# Altium PCB 60ghz radar pcb.PcbDoc (part 1 of 2)
Units mil, origin at the board's own origin, x right, y up, seen from the top; angles counter-clockwise.
Board outline 1181.1 x 787.4 mil, 4 copper layers (Top Layer, Mid Layer 1, Mid Layer 2, Bottom Layer), stack 61.811 mil thick; 51 components, 49 nets, 258 pads, 81 vias.
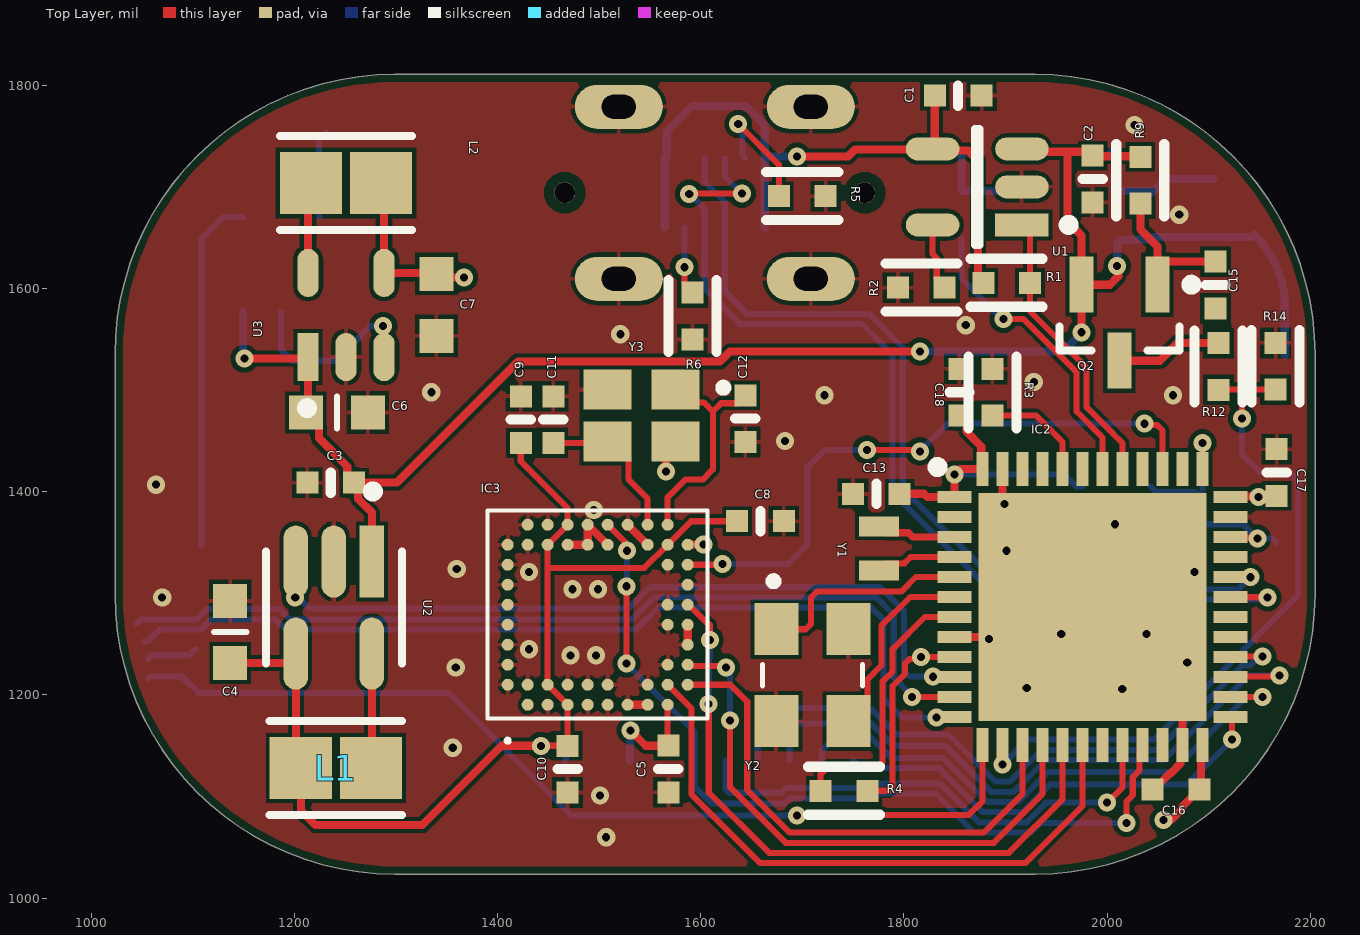
[diagram p0: Top Layer view]
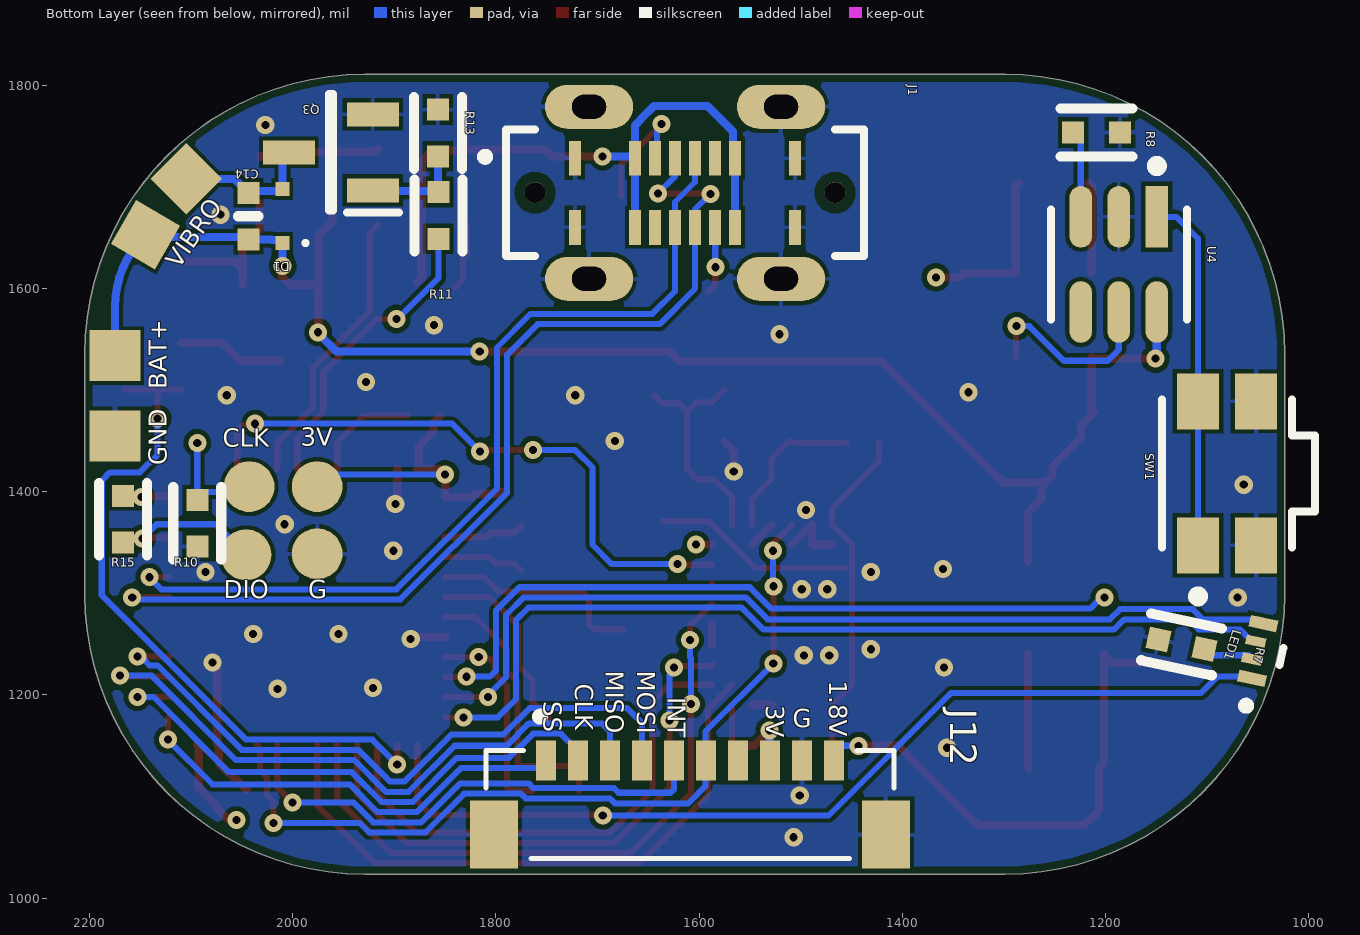
[diagram p1: Bottom Layer view, seen from below]
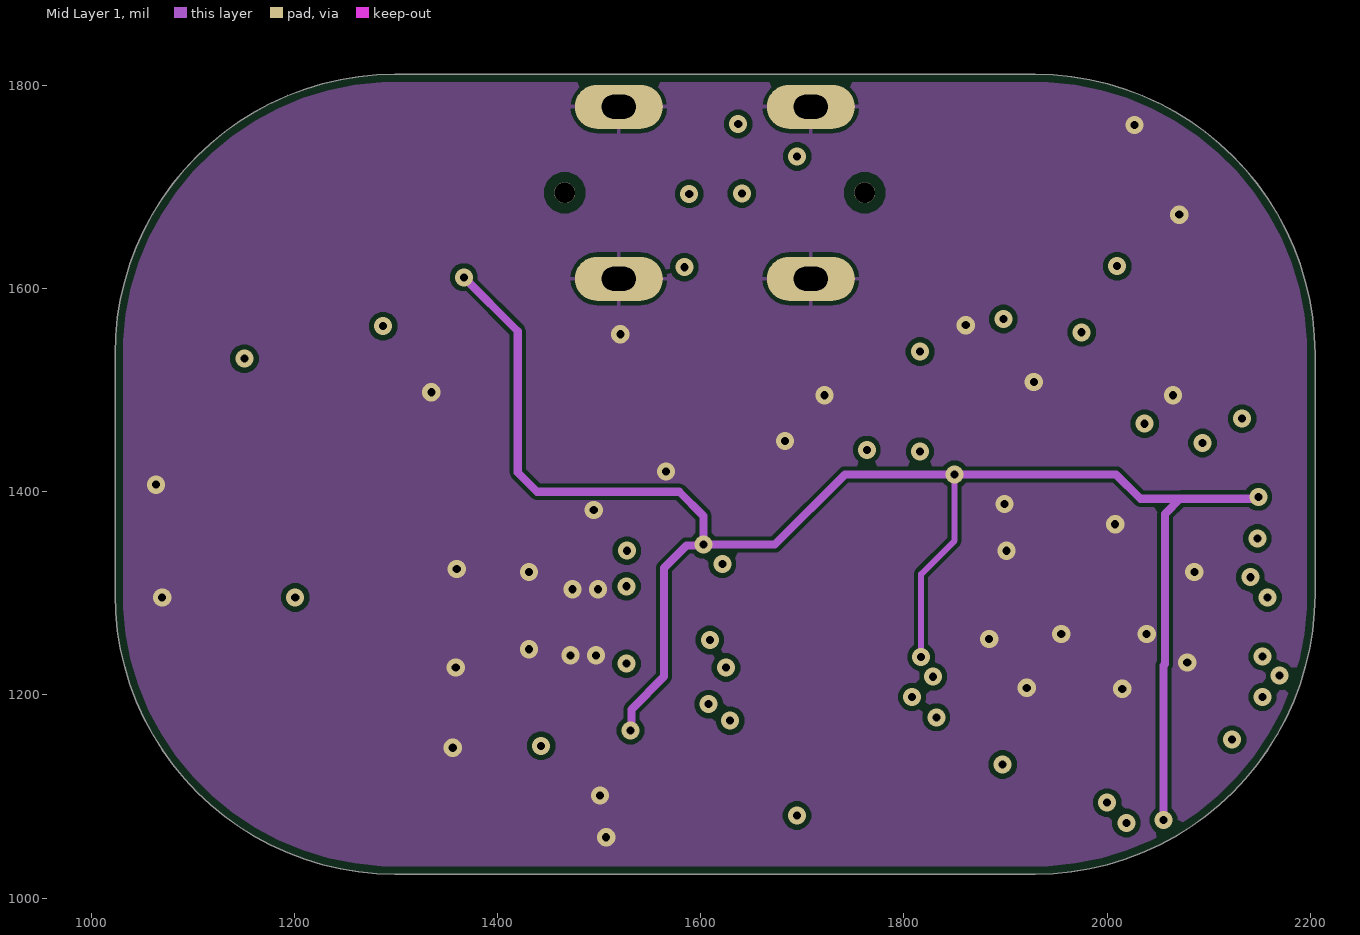
[diagram p2: Mid Layer 1]
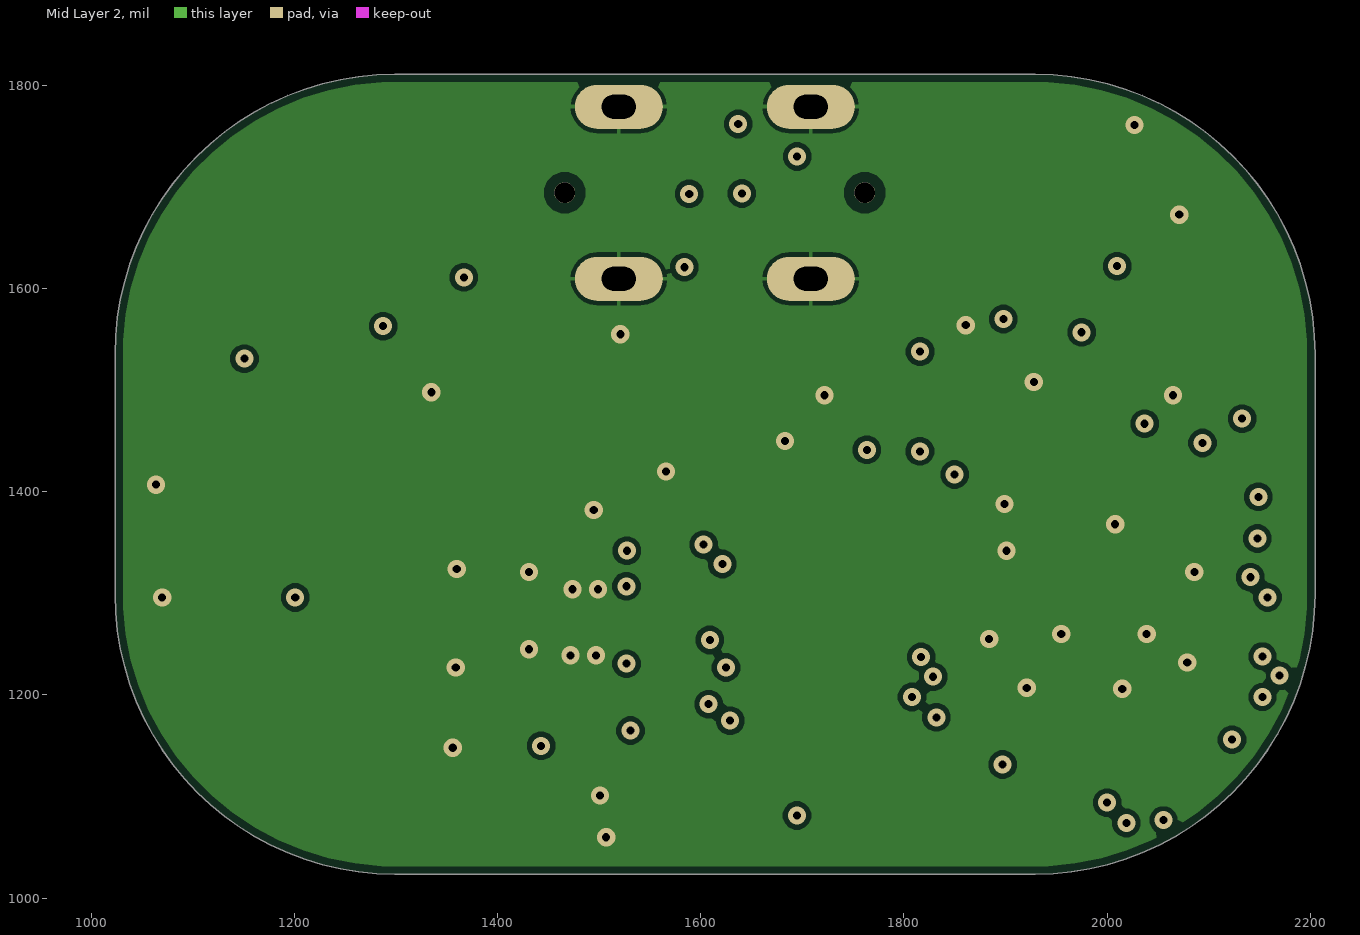
[diagram p3: Mid Layer 2]
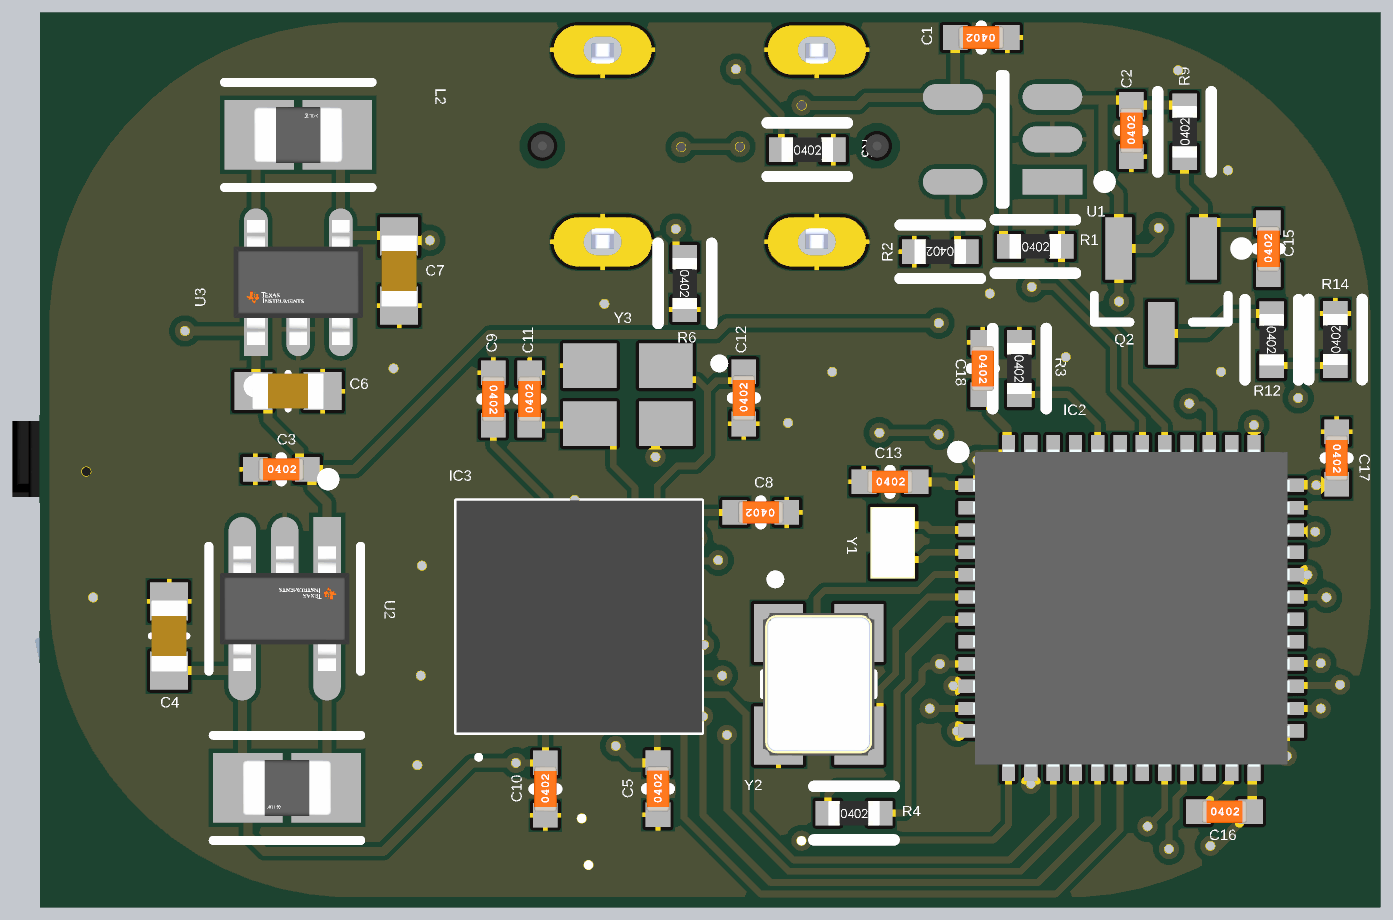
[diagram p4: 3D render of the assembled board from above, using the file's embedded part models]
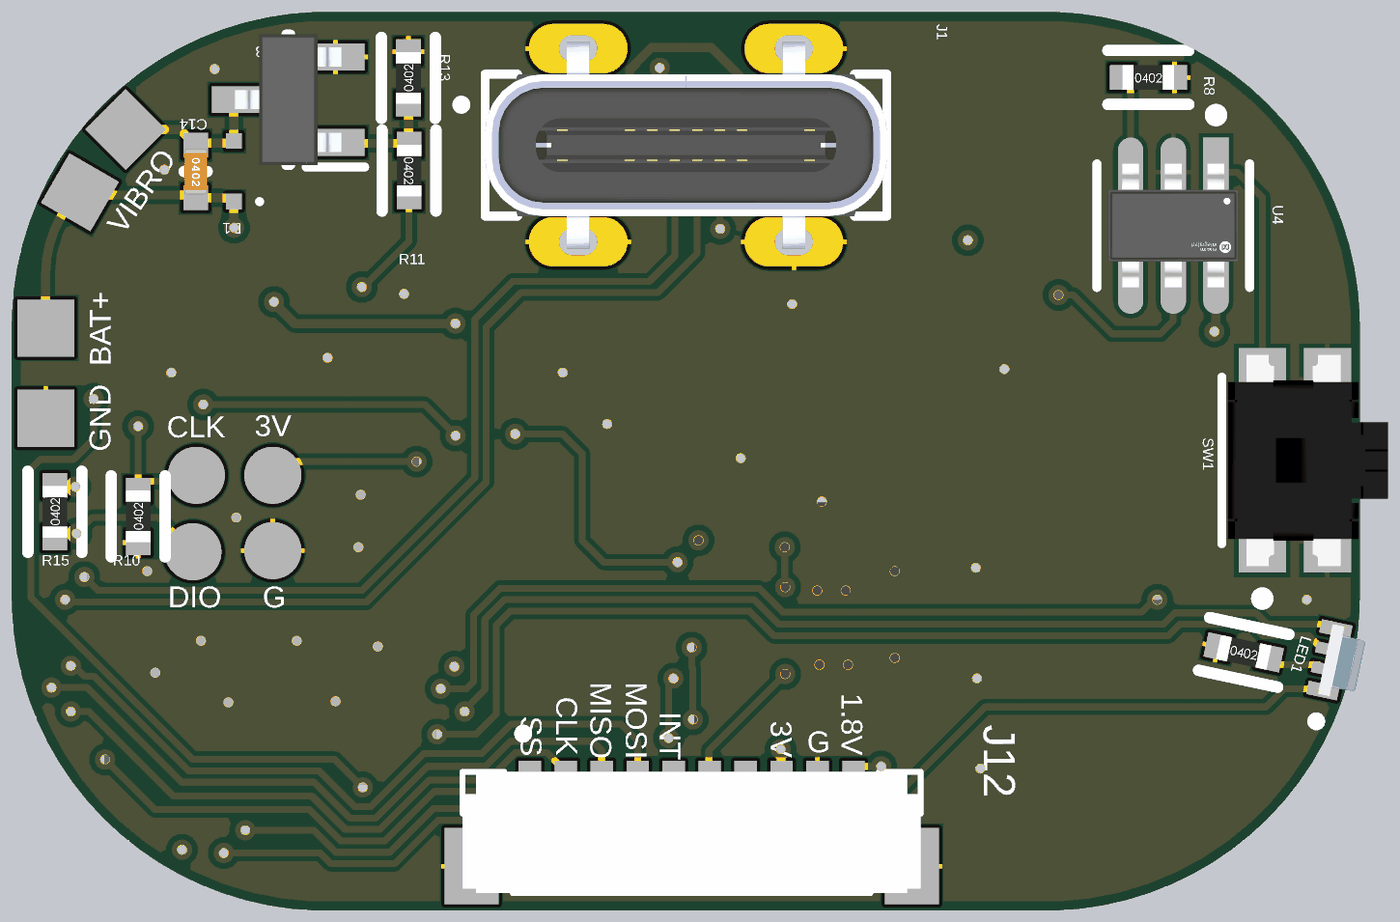
[diagram p5: 3D render of the assembled board from below, using the file's embedded part models]

## Layer stack, top to bottom
Top Solder: solder mask 0.5, Solder Resist, Dk 3.8
Top Layer: signal copper 1.378
Dielectric 1: prepreg 3.937, 2313, Dk 4.05
Mid Layer 1: signal copper 0.689
Core: core 49.8031, FR-4, Dk 4.5
Mid Layer 2: signal copper 0.689
Dielectric 2: prepreg 3.937, 2313, Dk 4.05
Bottom Layer: signal copper 1.378
Bottom Solder: solder mask 0.5, Solder Resist, Dk 3.8

## Board outline
1023.62,1299.21 1023.62,1535.43 cw(c1299.21,1535.43) 1299.21,1811.02 1929.13,1811.02 cw(c1929.13,1535.43) 2204.72,1535.43 2204.72,1299.21 cw(c1929.13,1299.21) 1929.13,1023.62 1299.21,1023.62 cw(c1299.21,1299.21)

## Design rules (kind name [scope] priority, off if disabled: settings)
BoardOutlineClearance [All] p1: gap=7.87 ignorepadtopadclearanceinfootprint=FALSE
Clearance [All] p1: gap=4 ignorepadtopadclearanceinfootprint=FALSE except(5: Arc-Via Track-Via SMDPad-Via THPad-Via Via-Via Via-Fill Via-Poly Via-Region Via-Text; 9.84: Arc-Hole Track-Hole SMDPad-Hole THPad-Hole Via-Hole Fill-Hole Poly-Hole Region-Hole Text-Hole)
ComponentClearance [All] p1: gap=4 collisioncheckmode=3 verticalgap=4 showdistances=TRUE
DiffPairsRouting [All] p1: maxlimit=4 minlimit=4 mostfreqgap=4 toplayer_minwidth=4 toplayer_maxwidth=71497.94 toplayer_prefwidth=4 midlayer1_minwidth=4 midlayer1_maxwidth=71497.94 midlayer1_prefwidth=4 midlayer2_minwidth=4 midlayer2_maxwidth=71497.94 midlayer2_prefwidth=4 bottomlayer_minwidth=4 bottomlayer_maxwidth=71497.94 bottomlayer_prefwidth=4 maxuncoupledlength=500
Height [All] p1: minheight=0 maxheight=71497.94 prefheight=500
HoleSize [All] p1: absolutevalues=TRUE maxlimit=248.03 minlimit=7.87 maxpercent=80.000 minpercent=20.000
HoleToHoleClearance [All] p1: gap=9.84 allowstackedmicrovias=FALSE
MinimumAnnularRing [All] p1: minimumring=3
MinimumSolderMaskSliver [All] p1: minsoldermaskwidth=0
PlaneClearance [All] p1: clearance=4
PlaneConnect PlaneConnectPowerPads [InPadClass('PowerPads')] p1: planeconnectstyle=Direct reliefexpansion=20 reliefentries=4 reliefconductorwidth=10 reliefairgap=10
PlaneConnect [All] p2: pad.planeconnectstyle=Relief pad.reliefexpansion=11.81 pad.reliefentries=4 pad.reliefconductorwidth=4 pad.reliefairgap=4 via.planeconnectstyle=Direct via.reliefexpansion=11.81 via.reliefentries=4 via.reliefconductorwidth=5 via.reliefairgap=5
PolygonConnect PolygonConnectPowerPads [All vs (InPadClass('PowerPads'))] p1: connectstyle=Direct reliefconductorwidth=10 reliefentries=4 polygonreliefangle="90 Angle" airgapwidth=10
PolygonConnect [All] p2: thpad.connectstyle=Relief thpad.reliefconductorwidth=4 thpad.reliefentries=4 thpad.polygonreliefangle="90 Angle" thpad.airgapwidth=4 smdpad.connectstyle=Relief smdpad.reliefconductorwidth=4 smdpad.reliefentries=4 smdpad.polygonreliefangle="90 Angle" smdpad.airgapwidth=4 via.connectstyle=Direct via.reliefconductorwidth=5 via.reliefentries=4 via.polygonreliefangle="90 Angle" via.airgapwidth=5
RoutingVias [All] p1: holewidth=7.87 width=17.72 viastyle="Through Hole" minholewidth=7.87 minwidth=17.72 maxholewidth=248.03 maxwidth=257.87
SilkToSilkClearance [All] p1: silktosilkclearance=0
SilkToSolderMaskClearance [IsPad] p1: minsilkscreentomaskgap=4 clearancetoexposedcopper=TRUE
SolderMaskExpansion [All] p1: expansion=2.95 istentingtop=FALSE
Width [All] p1: maxlimit=71497.94 minlimit=4 preferedwidth=4
20 further rules are at their usual default settings.

## Classes and differential pairs
component class "radar sch": C5 C8 C9 C10 C11 C12 IC3 J12 Y3
component class "power schematic": C1 C2 C3 C4 C6 C7 L1 L2 R1 R2 R8 SW1 U1 U2 U3 U4
component class "main sch": C13 C16 C17 C18 IC2 J1 LED1 R3 R4 R5 R6 R7 R10 R15 Y1 Y2
component class "battery check and motor": C14 C15 D1 Q2 Q3 R9 R11 R12 R13 R14

## Components (designator, comment, footprint, x,y, rotation, side; value= is the part's Value field where it differs from the comment)
C1 "4.7µF" SMD-0402C 1853.5,1789.93 r90 top
C2 "4.7µF" SMD-0402C 1985.95,1707.91 r0 top
C3 "10µF" SMD-0402C 1236,1409 r270 top
C4 "22µF" SMD-0603C 1137,1262 r180 top
C5 "1µF" SMD-0402C 1568.29,1127.16 r0 top
C6 "22µF" SMD-0603C 1242,1478 r90 top
C7 "22µF" SMD-0603C 1340,1584 r0 top
C8 "1µF" SMD-0402C 1659,1371 r90 top
C9 "1µF" SMD-0402C 1423,1471 r180 top
C10 "1µF" SMD-0402C 1469,1127 r0 top
C11 "8pF" SMD-0402C 1455,1471 r0 top
C12 "8pF" SMD-0402C 1644,1472 r0 top
C13 "1µF" SMD-0402C 1773,1398 r270 top
C14 "0.10µF" SMD-0402C 2043.64,1671.24 r0 bottom
C15 "0.10µF" SMD-0402C 2106.81,1603.57 r0 top
C16 "0.10µF" SMD-0402C 2068,1107 r270 top
C17 "0.10µF" SMD-0402C 2167,1419 r180 top
C18 "4.7µF" SMD-0402C 1854.82,1497.94 r180 top
D1 "BAT54-02V" INF-SC79_V 2010.21,1671.24 r90 bottom
IC2 "STM32L433CCU6" QFN50P700X700X60-49N-D 1985.8,1286.57 r0 top
IC3 "A121-001-T&R" A121001TR 1498.7,1278.98 r90 top
J1 "USB4120-03-C_REVA" GCT_USB4120-03-C_REVA 1613.94,1694.29 r180 bottom
J12 "10144041-10011LF" AMPHENOL_10144041-10011LF 1609,1092 r180 bottom
L1 "MLZ2012N2R2LT000" FP-MLZ2012-0_85-IPC_A 1241,1128 r180 top
L2 "MLZ2012N2R2LT000" FP-MLZ2012-0_85-IPC_A 1251,1704 r0 top
LED1 "IN-S63TBS5R5G5B" INS63TBS5R5G5B 1054.08,1244.14 r12 bottom
Q2 "NX3008PBK,215" NXP-SOT23_N 2012.17,1566.4 r270 top
Q3 "SI2312BDS-T1-BE3" SOT95P237X112-3N 1962.47,1734.14 r0 bottom
R1 "DNP" SMD-0402-RES 1901.2,1605.67 r270 top value=10k
R2 "3.3k" SMD-0402-RES 1817.27,1600.95 r90 top
R3 "10k" SMD-0402-RES 1887.13,1497.87 r180 top
R4 "10k" SMD-0402-RES 1741.16,1105.71 r270 top
R5 "5.1k" SMD-0402-RES 1700,1691 r270 top
R6 "5.1k" SMD-0402-RES 1592,1573 r180 top
R7 "330" SMD-0402-RES 1125.29,1249.84 r282 bottom
R8 "10k" SMD-0402-RES 1208.84,1753.65 r270 bottom
R9 "1M" SMD-0402-RES 2032.79,1706.69 r0 top
R10 "100k" SMD-0402-RES 2094,1369 r180 bottom
R11 "470" SMD-0402-RES 1856.67,1672.03 r0 bottom
R12 "100k" SMD-0402-RES 2109.71,1523.28 r180 top
R13 "10k" SMD-0402-RES 1857.22,1753.2 r180 bottom
R14 "100k" SMD-0402-RES 2165.88,1523.47 r0 top
R15 "100k" SMD-0402-RES 2167,1373 r180 bottom
SW1 "EVQ-P7A01P" FP-EVQ-P7A01P-MFG 1067.68,1418.07 r90 bottom
U1 "MCP73831T-2ACI/OT" FP-C04-091-OT-IPC_B 1872.31,1700.05 r180 top
U2 "LM3671MF-1.8/NOPB" FP-DBV0005A-IPC_A 1239,1286 r270 top
U3 "LM3671MF-3.3/NOPB" FP-DBV0005A-IPC_C 1251,1574 r90 top
U4 "MAX16054AZT+T" FP-Z6-1-IPC_A 1186.99,1623.77 r270 bottom
Y1 "ECS-.327-12.5-16-TR" XTAL_ECS-.327-12.5-16-TR 1775.54,1344.37 r270 top
Y2 "ECS-80-12-33-JGN-TR" XTAL_ECS-240-8-33-AGN-TR 1710.02,1219.42 r270 top
Y3 "ECS-240-8-36-RWN-TR3" XTAL_ECS-240-8-36-RWN-TR3 1541.71,1474.84 r180 top

## Footprints (in the part's own frame and the unit in brackets; to place one, negate y for a bottom-side part, rotate by r counter-clockwise, add the part's x,y. Pads: shape width x height; smd on the part's side, far side on the other; paste and mask are expansions set on the pad)
A121001TR [mm]
  round 0.3 smd: A2(-1.75,2.25) A3(-1.25,2.25) A4(-0.75,2.25) A5(-0.25,2.25) A6(0.25,2.25) A7(0.75,2.25) A8(1.25,2.25) A9(1.75,2.25) B1(-2.25,1.75) B2(-1.75,1.75) B9(1.75,1.75) B10(2.25,1.75) C1(-2.25,1.25) C2(-1.75,1.25) C9(1.75,1.25) C10(2.25,1.25) D1(-2.25,0.75) D2(-1.75,0.75) D9(1.75,0.75) D10(2.25,0.75) E1(-2.25,0.25) E2(-1.75,0.25) E9(1.75,0.25) E10(2.25,0.25) F1(-2.25,-0.25) F2(-1.75,-0.25) F9(1.75,-0.25) F10(2.25,-0.25) G1(-2.25,-0.75) G10(2.25,-0.75) H1(-2.25,-1.25) H2(-1.75,-1.25) H9(1.75,-1.25) H10(2.25,-1.25) J1(-2.25,-1.75) J2(-1.75,-1.75) J3(-1.25,-1.75) J5(-0.25,-1.75) J6(0.25,-1.75) J8(1.25,-1.75) J9(1.75,-1.75) J10(2.25,-1.75) K2(-1.75,-2.25) K3(-1.25,-2.25) K4(-0.75,-2.25) K5(-0.25,-2.25) K6(0.25,-2.25) K7(0.75,-2.25) K8(1.25,-2.25) K9(1.75,-2.25)
  silkscreen extent -3.2,-2.75 2.6,2.75, body extent -2.6,-2.75 2.6,2.75, height 0.88
AMPHENOL_10144041-10011LF [mm]
  rect 0.5x1 smd: 1(-3.6,1.1) 2(-2.8,1.1) 3(-2,1.1) 4(-1.2,1.1) 5(-0.4,1.1) 6(0.4,1.1) 7(1.2,1.1) 8(2,1.1) 9(2.8,1.1) 10(3.6,1.1)
  rect 1.2x1.7 smd: S1(-4.9,-0.75) S2(4.9,-0.75)
  silkscreen extent -5.1,-1.35 5.1,2.3, body extent -5.1,-1.35 5.1,1.35, height 1.72
FP-C04-091-OT-IPC_B [mm]
  rect 1.338x0.578 smd paste+0 mask+0: 1(-1.116,0.95)
  rrect100% 1.338x0.578 smd paste+0 mask+0: 2(-1.116,0) 3(-1.116,-0.95) 4(1.116,-0.95) 5(1.116,0.95)
  silkscreen extent -2.41,-1.45 0.05,1.45
FP-DBV0005A-IPC_A [mm]
  rect 1.805x0.612 smd paste+0 mask+0: 1(-1.15,0.95)
  rrect100% 1.805x0.612 smd paste+0 mask+0: 2(-1.15,0) 3(-1.15,-0.95) 4(1.15,-0.95) 5(1.15,0.95)
  silkscreen extent -3.03,-1.7 1.4,1.7, body extent -2.55,-1.95 2.55,1.95, height 0.25
FP-DBV0005A-IPC_C [mm]
  rect 1.205x0.532 smd paste+0 mask+0: 1(-1.05,0.95)
  rrect100% 1.205x0.532 smd paste+0 mask+0: 2(-1.05,0) 3(-1.05,-0.95) 4(1.05,-0.95) 5(1.05,0.95)
  silkscreen extent -2.45,0.85 -2.2,1.1, body extent -1.75,-1.55 1.75,1.55, height 0.25
FP-EVQ-P7A01P-MFG [mm]
  rect 1.4x1.05 smd paste+0 mask+0: 1(-1.8,1.05) 1'(1.8,1.05) 2(-1.8,-0.4) 2'(1.8,-0.4)
  silkscreen extent -3.2,-1.88 1.85,1.95, body extent -2.35,-1.74 2.35,1.81, height 1.36
FP-MLZ2012-0_85-IPC_A [mil]
  rect 61.2x61.27 smd paste+0 mask+0: 1(-34.48,0) 2(34.48,0)
  silkscreen extent -65,-46 65,46, body extent -85,-50 85,50, height 10
FP-Z6-1-IPC_A [mm]
  rect 1.54x0.566 smd paste+0 mask+0: 1(-1.19,0.95)
  rrect100% 1.54x0.566 smd paste+0 mask+0: 2(-1.19,0) 3(-1.191,-0.95) 4(1.191,-0.95) 5(1.191,0) 6(1.191,0.95)
  silkscreen extent -2.59,-1.7 1.38,1.7, body extent -1.38,-1.45 1.38,1.45, height 1.1
GCT_USB4120-03-C_REVA [mm]
  rect 0.3x0.87 smd: A1(-2.75,0.865) A4(-1.25,0.865) A5(-0.75,0.865) A6(-0.25,0.865) A7(0.25,0.865) A8(0.75,0.865) A9(1.25,0.865) A12(2.75,0.865) B1(2.75,-0.865) B4(1.25,-0.865) B5(0.75,-0.865) B6(0.25,-0.865) B7(-0.25,-0.865) B8(-0.75,-0.865) B9(-1.25,-0.865) B12(-2.75,-0.865)
  oval 2.2x1.1 hole 0.6 slot 0.85 at 0 deg: S1(-2.4,2.15) S2(-2.4,-2.15) S3(2.4,2.15) S4(2.4,-2.15)
  round 0.52 hole 0.52 unplated: ""(-3.75,0) ""(3.75,0)
  silkscreen extent -5.1,-1.58 4.47,1.58, body extent -4.47,-2.3 4.47,2.3, height 6.5
INF-SC79_V [mm]
  rect 0.35x0.35 smd: 1(-0.672,0) 2(0.678,0)
  silkscreen extent -0.72,-0.62 -0.62,-0.53, body extent -0.6,-0.4 0.6,0.4, height 0.59
INS63TBS5R5G5B [mm]
  rect 0.7x0.3 smd: 1(-0.1,0.7) 4(-0.1,-0.7)
  rect 0.5x0.25 smd: 2(0,0.225) 3(0,-0.225)
  silkscreen extent -0.71,-0.2 0,1.5, body extent -0.8,-0.8 0,0.8, height 0.5
NXP-SOT23_N [mm]
  rect 1.4x0.6 smd: 1(-0.95,0.95) 2(-0.95,-0.95) 3(0.95,0)
  silkscreen extent -1.07,-1.5 0.7,1.93, body extent -0.7,-1.5 0.7,1.5, height 1.1
QFN50P700X700X60-49N-D [mm]
  rect 0.85x0.3 smd: 1(-3.45,2.75) 2(-3.45,2.25) 3(-3.45,1.75) 4(-3.45,1.25) 5(-3.45,0.75) 6(-3.45,0.25) 7(-3.45,-0.25) 8(-3.45,-0.75) 9(-3.45,-1.25) 10(-3.45,-1.75) 11(-3.45,-2.25) 12(-3.45,-2.75) 25(3.45,-2.75) 26(3.45,-2.25) 27(3.45,-1.75) 28(3.45,-1.25) 29(3.45,-0.75) 30(3.45,-0.25) 31(3.45,0.25) 32(3.45,0.75) 33(3.45,1.25) 34(3.45,1.75) 35(3.45,2.25) 36(3.45,2.75)
  rect 0.3x0.85 smd: 13(-2.75,-3.45) 14(-2.25,-3.45) 15(-1.75,-3.45) 16(-1.25,-3.45) 17(-0.75,-3.45) 18(-0.25,-3.45) 19(0.25,-3.45) 20(0.75,-3.45) 21(1.25,-3.45) 22(1.75,-3.45) 23(2.25,-3.45) 24(2.75,-3.45) 37(2.75,3.45) 38(2.25,3.45) 39(1.75,3.45) 40(1.25,3.45) 41(0.75,3.45) 42(0.25,3.45) 43(-0.25,3.45) 44(-0.75,3.45) 45(-1.25,3.45) 46(-1.75,3.45) 47(-2.25,3.45) 48(-2.75,3.45)
  rect 5.7x5.7 smd: 49(0,0)
  silkscreen extent -4,3.38 -3.75,3.62, body extent -3.55,-3.55 3.55,3.55, height 0.6
SMD-0402-RES [mm]
  rect 0.55x0.55 smd: 1(0,0.584) 2(0,-0.584)
  silkscreen extent -0.6,-0.9 0.6,0.9, body extent -0.27,-0.57 0.28,0.58, height 0.41
SMD-0402C [mm]
  rect 0.55x0.55 smd: 1(0,0.584) 2(0,-0.584)
  silkscreen extent -0.25,0 0.25,0, body extent -0.25,-0.51 0.25,0.51, height 0.51
SMD-0603C [mm]
  rect 0.85x0.85 smd: 1(0,0.775) 2(0,-0.775)
  silkscreen extent -0.4,0 0.4,0, body extent -0.4,-0.8 0.4,0.8, height 0.9
SOT95P237X112-3N [mm]
  rect 1.3x0.6 smd: 1(-1.05,0.95) 2(-1.05,-0.95) 3(1.05,0)
  silkscreen extent -1.7,-1.46 0.05,1.5, body extent -1.19,-1.46 1.18,1.46, height 1.12
XTAL_ECS-240-8-33-AGN-TR [mm]
  rect 1.3x1.1 smd: 1(-1.15,-0.9) 2(1.15,-0.9) 3(1.15,0.9) 4(-1.15,0.9)
  silkscreen extent -2.45,-1.25 0.27,1.25, body extent -1.6,-1.25 1.6,1.25, height 0.8
XTAL_ECS-240-8-36-RWN-TR3 [mm]
  rect 1.2x1 smd: 1(-0.85,-0.65) 2(0.85,-0.65) 3(0.85,0.65) 4(-0.85,0.65)
  silkscreen extent -2.15,-0.8 -1.95,-0.6
XTAL_ECS-.327-12.5-16-TR [mm]
  rect 0.5x1 smd: 1(-0.55,0) 2(0.55,0)
  body extent -0.8,-0.5 0.8,0.5, height 0.5

## Part data
C1 C2: library part ZRB15XR61A475KE01D, "CAP CER 4.7UF 10V X5R 0402", Digi-Key Part Number=490-13252-1-ND, Manufacturer="Murata Electronics North America", Operating Temperature="-55°C ~ 85°C", Package / Case="0402 (1005 Metric)", Ratings=-, Temperature Coefficient=X5R, Tolerance=±10%, Voltage=10V, @ qty=0, Applications="Acoustic Noise Reduction", Datasheets=http://search.murata.co.jp/Ceramy/image/img/A01X/G101/ENG/ZRB15XR61A475KE01-01.pdf, Factory Stock=0, Features="Derating Recommended, Interposer Termination", Height - Seated (Max)=-, Image=//media.digikey.com/Renders/Murata%20Renders/ZRB-SERIES-0402.jpg, Lead Spacing=-, Lead Style=-, Minimum Quantity=1, Mounting Type="Surface Mount, MLCC", Packaging="Cut Tape (CT)", Part Number=ZRB15XR61A475KE01D, Part Status=Active, Quantity Available=23076, Series=ZRB, Size / Dimension="0.039\" L x 0.020\" W (1.00mm x 0.50mm)", Thickness (Max)="0.031\" (0.80mm)", Unit Price (USD)=0.28
C3: library part GRJ155R60J106ME11D, "CAP CER 10UF 6.3V X5R 0402", Digi-Key Part Number=490-13211-1-ND, Manufacturer="Murata Electronics North America", Operating Temperature="-55°C ~ 85°C", Package / Case="0402 (1005 Metric)", Ratings=-, Temperature Coefficient=X5R, Tolerance=±20%, Voltage=6.3V, @ qty=0, Applications="Boardflex Sensitive", Datasheets=http://psearch.en.murata.com/capacitor/product/GRJ155R60J106ME11%23.pdf, Factory Stock=0, Features="Derating Recommended, Soft Termination", Height - Seated (Max)=-, Image=//media.digikey.com/Renders/Murata%20Renders/ZRB-SERIES-0402.jpg, Lead Spacing=-, Lead Style=-, Minimum Quantity=1, Mounting Type="Surface Mount, MLCC", Packaging="Cut Tape (CT)", Part Number=GRJ155R60J106ME11D, Part Status=Active, Quantity Available=64064, Series=GRJ, Size / Dimension="0.039\" L x 0.020\" W (1.00mm x 0.50mm)", Thickness (Max)="0.028\" (0.70mm)", Unit Price (USD)=0.23
C4 C6 C7: library part GRM186R60J226ME15D, "CAP CER 22UF 6.3V X5R 0603", Digi-Key Part Number=490-13241-1-ND, Manufacturer="Murata Electronics North America", Operating Temperature="-55°C ~ 85°C", Package / Case="0603 (1608 Metric)", Ratings=-, Temperature Coefficient=X5R, Tolerance=±20%, Voltage=6.3V, @ qty=0, Applications="General Purpose", Datasheets=http://psearch.en.murata.com/capacitor/product/GRM186R60J226ME15%23.pdf, Factory Stock=0, Features="Derating Recommended", Height - Seated (Max)=-, Image=//media.digikey.com/Renders/Murata%20Renders/ZRB-SERIES-0402.jpg, Lead Spacing=-, Lead Style=-, Minimum Quantity=1, Mounting Type="Surface Mount, MLCC", Packaging="Cut Tape (CT)", Part Number=GRM186R60J226ME15D, Part Status=Active, Quantity Available=5072, Series=GRM, Size / Dimension="0.063\" L x 0.031\" W (1.60mm x 0.80mm)", Thickness (Max)="0.028\" (0.70mm)", Unit Price (USD)=0.32
C5 C8 C9 C10 C13: library part GCM155C71A105KE38D, "CAP CER 1UF 10V X7S 0402", Digi-Key Part Number=490-13409-1-ND, Manufacturer="Murata Electronics North America", Operating Temperature="-55°C ~ 125°C", Package / Case="0402 (1005 Metric)", Ratings=AEC-Q200, Temperature Coefficient=X7S, Tolerance=±10%, Voltage=10V, @ qty=0, Applications=Automotive, Datasheets=http://www.murata.com/~/media/webrenewal/support/library/catalog/products/capacitor/mlcc/c03e.ashx, Factory Stock=0, Features=-, Height - Seated (Max)=-, Image=//media.digikey.com/Renders/Murata%20Renders/ZRB-SERIES-0402.jpg, Lead Spacing=-, Lead Style=-, Minimum Quantity=1, Mounting Type="Surface Mount, MLCC", Packaging="Cut Tape (CT)", Part Number=GCM155C71A105KE38D, Part Status=Active, Quantity Available=7240, Series=GCM, Size / Dimension="0.039\" L x 0.020\" W (1.00mm x 0.50mm)", Thickness (Max)="0.022\" (0.55mm)", Unit Price (USD)=0.12
C11 C12: library part GRM1555C1H8R0BA01D, "CAP CER 8PF 50V NP0 0402", Digi-Key Part Number=490-8230-1-ND, Manufacturer="Murata Electronics North America", Operating Temperature="-55°C ~ 125°C", Package / Case="0402 (1005 Metric)", Ratings=-, Temperature Coefficient="C0G, NP0", Tolerance=±0.1pF, Voltage=50V, @ qty=0, Applications="General Purpose", Datasheets=http://www.murata.com/~/media/webrenewal/support/library/catalog/products/capacitor/mlcc/c02e.pdf, Factory Stock=0, Features=-, Height - Seated (Max)=-, Image=//media.digikey.com/Renders/Murata%20Renders/ZRB-SERIES-0402.jpg, Lead Spacing=-, Lead Style=-, Minimum Quantity=1, Mounting Type="Surface Mount, MLCC", Packaging="Cut Tape (CT)", Part Number=GRM1555C1H8R0BA01D, Part Status=Active, Quantity Available=3665, Series=GRM, Size / Dimension="0.039\" L x 0.020\" W (1.00mm x 0.50mm)", Thickness (Max)="0.022\" (0.55mm)", Unit Price (USD)=0.1
C14 C15 C16 C17: library part GCM155R71C104KA55D, "CAP CER 0.1UF 16V X7R 0402", Digi-Key Part Number=490-4759-1-ND, Manufacturer="Murata Electronics North America", Operating Temperature="-55°C ~ 125°C", Package / Case="0402 (1005 Metric)", Ratings=AEC-Q200, Temperature Coefficient=X7R, Tolerance=±10%, Voltage=16V, @ qty=0, Applications=Automotive, Datasheets=http://www.murata.com/~/media/webrenewal/support/library/catalog/products/capacitor/mlcc/c03e.ashx, Factory Stock=0, Features=-, Height - Seated (Max)=-, Image=//media.digikey.com/Renders/Murata%20Renders/ZRB-SERIES-0402.jpg, Lead Spacing=-, Lead Style=-, Minimum Quantity=1, Mounting Type="Surface Mount, MLCC", Packaging="Cut Tape (CT)", Part Number=GCM155R71C104KA55D, Part Status=Active, Quantity Available=734194, Series=GCM, Size / Dimension="0.039\" L x 0.020\" W (1.00mm x 0.50mm)", Thickness (Max)="0.022\" (0.55mm)", Unit Price (USD)=0.1
C18: library part GRM153R60J475ME15D, "CAP CER 4.7UF 6.3V X5R 0402", Digi-Key Part Number=490-13232-1-ND, Manufacturer="Murata Electronics North America", Operating Temperature="-55°C ~ 85°C", Package / Case="0402 (1005 Metric)", Ratings=-, Temperature Coefficient=X5R, Tolerance=±20%, Voltage=6.3V, @ qty=0, Applications="General Purpose", Datasheets=http://psearch.en.murata.com/capacitor/product/GRM153R60J475ME15%23.pdf, Factory Stock=0, Features="Derating Recommended", Height - Seated (Max)=-, Image=//media.digikey.com/Renders/Murata%20Renders/ZRB-SERIES-0402.jpg, Lead Spacing=-, Lead Style=-, Minimum Quantity=1, Mounting Type="Surface Mount, MLCC", Packaging="Cut Tape (CT)", Part Number=GRM153R60J475ME15D, Part Status=Active, Quantity Available=30412, Series=GRM, Size / Dimension="0.039\" L x 0.020\" W (1.00mm x 0.50mm)", Thickness (Max)="0.013\" (0.33mm)", Unit Price (USD)=0.27
D1: library part CMP-1182-00001-1, "Silicon Schottky Diode, SC79, Reel, Green", Manufacturer=Infineon, ComponentLink1Description="Manufacturer URL", ComponentLink1URL=http://www.infineon.com/, ComponentLink2Description=Datasheet, ComponentLink2URL=http://www.infineon.com/dgdl/bat54series.pdf?folderId=db3a30431400ef68011425f1ca2505e3&fileId=db3a304314dca3890115190b74210ea6, ComponentLink3Description="Package Specification", ComponentLink3URL=http://www.infineon.com/dgdl/SC79-Package_Overview.pdf?folderId=db3a30431936bc4b011951fbddb03b15&fileId=db3a30431936bc4b01195226fe583b41, Green=TRUE, Halogen-free=FALSE, Mounting Technology="Surface Mount", PackageDescription="2-Pin Semiconductor Package, 0.8 x 1.2 mm Body", PackageReference=SC79, PartNumber=BAT54-02V, RevisionNote="Re-Activated Devices"
IC2: "Integrated Circuit", Manufacturer_Name=STMicroelectronics, Mouser Part Number=511-STM32L433CCU6, Arrow Part Number=STM32L433CCU6, Arrow Price/Stock=https://www.arrow.com/en/products/stm32l433ccu6/stmicroelectronics?region=nac, Datasheet Link=http://www.st.com/content/ccc/resource/technical/document/datasheet/f7/a0/fc/27/24/4e/4f/3f/DM00257192.pdf/files/DM00257192.pdf/jcr:content/translations/en.DM00257192.pdf, Height=0.6mm, Manufacturer_Part_Number=STM32L433CCU6, Mouser Price/Stock=https://www.mouser.co.uk/ProductDetail/STMicroelectronics/STM32L433CCU6?qs=dTJS0cRn7oiKq9T6SJeUpg%3D%3D
IC3: "Integrated Circuit", Manufacturer_Name="Acconeer AB", Mouser Part Number=925-A121-001-T&R, Datasheet Link=https://gr.mouser.com/datasheet/2/1126/A121_datasheet-3133196.pdf, Height=0.899mm, Manufacturer_Part_Number=A121-001-T&R, Mouser Price/Stock=https://www.mouser.co.uk/ProductDetail/Acconeer/A121-001-TR?qs=amGC7iS6iy%2F9krRiPHmNkQ%3D%3D
J1 J12 Y3: Package=None, Availability=Unavailable, Price=None
  J1: MF="{'manufacturer': u'Global Connector Technology'}", MP=USB4120-03-C_REVA
  J12: MF="{'manufacturer': u'Amphenol ICC (FCI)'}", MP=10144041-10011LF
  Y3: MF="{'manufacturer': u'ECS Inc.'}", MP=ECS-240-8-36-RWN-TR3
L1 L2: library part CMP-08253-000395-1, "Shielded Multilayer Inductor 2.2uH ±20% 800mA 156mΩ SMD 0805", Case Code (Imperial)=0805, Case Code (Metric)=2012, Current Rating=800mA, DC Resistance (DCR)=156mR, Inductance=2.2uH, Max Operating Temperature=125°C, Min Operating Temperature=-55°C, Package Quantity=1, Saturation Current=170mA, Self Resonant Frequency=120MHz, Test Frequency=2MHz, Tolerance=20%, Case/Package=0805, Core Material=Ferrite, Height - Seated (Max)=0.041inch, Length=0.079inch, Mount="Surface Mount", Packaging="Tape and Reel", RoHS Compliant=Yes, Shielding=Shielded, Width=0.049inch
LED1: "LED", Manufacturer_Name=Inolux, Mouser Part Number=743-IN-S63TBS5R5G5B, Arrow Part Number=IN-S63TBS5R5G5B, Arrow Price/Stock=https://www.arrow.com/en/products/in-s63tbs5r5g5b/inolux-corporation?region=nac, Datasheet Link=http://www.inolux-corp.com/datasheet/SMDLED/RGB%20Side%20View/IN-S63TBS5R5G5B_V1.0.pdf, Height=0.6mm, Manufacturer_Part_Number=IN-S63TBS5R5G5B, Mouser Price/Stock=https://www.mouser.co.uk/ProductDetail/Inolux/IN-S63TBS5R5G5B?qs=stqOd1AaK7%2Fi2QYkhDu%252BwA%3D%3D
Q2: library part CMP-1259-00084-1, "P-Channel Trench MOSFET, -30 V, -0.23 A, -55 to 150 degC, 3-Pin SOT23, Tape and Reel", Manufacturer="NXP Semiconductors", Automotive Qualified=Y, Channel Type=P, Code_JEDEC=TO-236AB, ComponentLink1Description="Manufacturer URL", ComponentLink1URL=http://www.nxp.com/, ComponentLink2Description=Datasheet, ComponentLink2URL=http://www.nxp.com/documents/data_sheet/NX3008PBK.pdf, ComponentLink3Description="Package Specification", ComponentLink3URL=http://www.nxp.com/documents/outline_drawing/sot023_po.pdf, DatasheetVersion="Rev. 1", ID [max] (A)=-0.23, IDM [max] (A)=-1, Mounting Technology="Surface Mount", PackageDescription="3-Pin Small Outline Transistor Package, Body 2.9 x 1.3 mm, Pitch 0.95 mm", PackageReference=SOT23, PackageVersion="06-03-16, 03/2006", Packing="Tape & Reel", PartNumber=NX3008PBK,215, VDS [max] (V)=-30, VGSth [typ] (V)=-0.9
Q3: "MOSFET (N-Channel)", Manufacturer_Name=Vishay, Mouser Part Number=78-SI2312BDS-T1-BE3, Arrow Part Number=SI2312BDS-T1-BE3, Arrow Price/Stock=https://www.arrow.com/en/products/si2312bds-t1-be3/vishay?region=nac, Datasheet Link=https://www.mouser.in/datasheet/2/427/VISH_S_A0010924773_1-2571514.pdf, Height=1.12mm, Manufacturer_Part_Number=SI2312BDS-T1-BE3, Mouser Price/Stock=https://www.mouser.co.uk/ProductDetail/Vishay-Siliconix/SI2312BDS-T1-BE3?qs=CiayqK2gdcLWl7ngxjbeYA%3D%3D
R1 R3 R4 R8 R13: library part ERJ-2GEJ103X, "RES SMD 10K OHM 5% 1/10W 0402", Digi-Key Part Number=P10KJCT-ND, Manufacturer="Panasonic Electronic Components", Operating Temperature="-55°C ~ 155°C", Package / Case="0402 (1005 Metric)", Power (Watts)="0.1W, 1/10W", Supplier Device Package=0402, Temperature Coefficient=±200ppm/°C, Tolerance=±5%, @ qty=1500, Composition="Thick Film", Datasheets=http://industrial.panasonic.com/www-cgi/jvcr13pz.cgi?E+PZ+3+AOA0001+ERJ2GEJ103X+7+WW, Factory Stock=0, Failure Rate=-, Features="Automotive AEC-Q200", Height - Seated (Max)="0.016\" (0.40mm)", Image=//media.digikey.com/Photos/Panasonic%20Photos/ERJ-PA2-Series.jpg, Minimum Quantity=1, Number of Terminations=2, Packaging="Cut Tape (CT)", Part Number=ERJ-2GEJ103X, Part Status=Active, Quantity Available=2560215, Series=ERJ, Size / Dimension="0.039\" L x 0.020\" W (1.00mm x 0.50mm)", Unit Price (USD)=0.00350
R2: library part ERJ-2GEJ332X, "RES SMD 3.3K OHM 5% 1/10W 0402", Digi-Key Part Number=P3.3KJCT-ND, Manufacturer="Panasonic Electronic Components", Operating Temperature="-55°C ~ 155°C", Package / Case="0402 (1005 Metric)", Power (Watts)="0.1W, 1/10W", Supplier Device Package=0402, Temperature Coefficient=±200ppm/°C, Tolerance=±5%, @ qty=1500, Composition="Thick Film", Datasheets=http://industrial.panasonic.com/www-cgi/jvcr13pz.cgi?E+PZ+3+AOA0001+ERJ2GEJ332X+7+WW, Factory Stock=0, Failure Rate=-, Features="Automotive AEC-Q200", Height - Seated (Max)="0.016\" (0.40mm)", Image=//media.digikey.com/Photos/Panasonic%20Photos/ERJ-PA2-Series.jpg, Minimum Quantity=1, Number of Terminations=2, Packaging="Cut Tape (CT)", Part Number=ERJ-2GEJ332X, Part Status=Active, Quantity Available=514266, Series=ERJ, Size / Dimension="0.039\" L x 0.020\" W (1.00mm x 0.50mm)", Unit Price (USD)=0.00350
R5 R6: library part ERJ-2GEJ512X, "RES SMD 5.1K OHM 5% 1/10W 0402", Digi-Key Part Number=P5.1KJCT-ND, Manufacturer="Panasonic Electronic Components", Operating Temperature="-55°C ~ 155°C", Package / Case="0402 (1005 Metric)", Power (Watts)="0.1W, 1/10W", Supplier Device Package=0402, Temperature Coefficient=±200ppm/°C, Tolerance=±5%, @ qty=1500, Composition="Thick Film", Datasheets=http://industrial.panasonic.com/www-cgi/jvcr13pz.cgi?E+PZ+3+AOA0001+ERJ2GEJ512X+7+WW, Factory Stock=0, Failure Rate=-, Features="Automotive AEC-Q200", Height - Seated (Max)="0.016\" (0.40mm)", Image=//media.digikey.com/Photos/Panasonic%20Photos/ERJ-PA2-Series.jpg, Minimum Quantity=1, Number of Terminations=2, Packaging="Cut Tape (CT)", Part Number=ERJ-2GEJ512X, Part Status=Active, Quantity Available=153265, Series=ERJ, Size / Dimension="0.039\" L x 0.020\" W (1.00mm x 0.50mm)", Unit Price (USD)=0.00350
R7: library part ERJ-2RKF3300X, "RES SMD 330 OHM 1% 1/10W 0402", Digi-Key Part Number=P330LCT-ND, Manufacturer="Panasonic Electronic Components", Operating Temperature="-55°C ~ 155°C", Package / Case="0402 (1005 Metric)", Power (Watts)="0.1W, 1/10W", Supplier Device Package=0402, Temperature Coefficient=±100ppm/°C, Tolerance=±1%, @ qty=1500, Composition="Thick Film", Datasheets=http://industrial.panasonic.com/www-cgi/jvcr13pz.cgi?E+PZ+3+AOA0002+ERJ2RKF3300X+7+WW, Factory Stock=0, Failure Rate=-, Features="Automotive AEC-Q200", Height - Seated (Max)="0.016\" (0.40mm)", Image=//media.digikey.com/Photos/Panasonic%20Photos/ERJ-PA2-Series.jpg, Minimum Quantity=1, Number of Terminations=2, Packaging="Cut Tape (CT)", Part Number=ERJ-2RKF3300X, Part Status=Active, Quantity Available=537077, Series=ERJ, Size / Dimension="0.039\" L x 0.020\" W (1.00mm x 0.50mm)", Unit Price (USD)=0.00496
R9: library part ERJ-2GEJ105X, "RES SMD 1M OHM 5% 1/10W 0402", Digi-Key Part Number=P1.0MJCT-ND, Manufacturer="Panasonic Electronic Components", Operating Temperature="-55°C ~ 155°C", Package / Case="0402 (1005 Metric)", Power (Watts)="0.1W, 1/10W", Supplier Device Package=0402, Temperature Coefficient=±200ppm/°C, Tolerance=±5%, @ qty=1500, Composition="Thick Film", Datasheets=http://industrial.panasonic.com/www-cgi/jvcr13pz.cgi?E+PZ+3+AOA0001+ERJ2GEJ105X+7+WW, Factory Stock=0, Failure Rate=-, Features="Automotive AEC-Q200", Height - Seated (Max)="0.016\" (0.40mm)", Image=//media.digikey.com/Photos/Panasonic%20Photos/ERJ-PA2-Series.jpg, Minimum Quantity=1, Number of Terminations=2, Packaging="Cut Tape (CT)", Part Number=ERJ-2GEJ105X, Part Status=Active, Quantity Available=1082572, Series=ERJ, Size / Dimension="0.039\" L x 0.020\" W (1.00mm x 0.50mm)", Unit Price (USD)=0.00350
R10 R12 R14 R15: library part ERJ-2GEJ104X, "RES SMD 100K OHM 5% 1/10W 0402", Digi-Key Part Number=P100KJCT-ND, Manufacturer="Panasonic Electronic Components", Operating Temperature="-55°C ~ 155°C", Package / Case="0402 (1005 Metric)", Power (Watts)="0.1W, 1/10W", Supplier Device Package=0402, Temperature Coefficient=±200ppm/°C, Tolerance=±5%, @ qty=1500, Composition="Thick Film", Datasheets=http://industrial.panasonic.com/www-cgi/jvcr13pz.cgi?E+PZ+3+AOA0001+ERJ2GEJ104X+7+WW, Factory Stock=0, Failure Rate=-, Features="Automotive AEC-Q200", Height - Seated (Max)="0.016\" (0.40mm)", Image=//media.digikey.com/Photos/Panasonic%20Photos/ERJ-PA2-Series.jpg, Minimum Quantity=1, Number of Terminations=2, Packaging="Cut Tape (CT)", Part Number=ERJ-2GEJ104X, Part Status=Active, Quantity Available=2387986, Series=ERJ, Size / Dimension="0.039\" L x 0.020\" W (1.00mm x 0.50mm)", Unit Price (USD)=0.00350
R11: library part ERJ-2RKF4700X, "RES SMD 470 OHM 1% 1/10W 0402", Digi-Key Part Number=P470LCT-ND, Manufacturer="Panasonic Electronic Components", Operating Temperature="-55°C ~ 155°C", Package / Case="0402 (1005 Metric)", Power (Watts)="0.1W, 1/10W", Supplier Device Package=0402, Temperature Coefficient=±100ppm/°C, Tolerance=±1%, @ qty=1500, Composition="Thick Film", Datasheets=http://industrial.panasonic.com/www-cgi/jvcr13pz.cgi?E+PZ+3+AOA0002+ERJ2RKF4700X+7+WW, Factory Stock=0, Failure Rate=-, Features="Automotive AEC-Q200", Height - Seated (Max)="0.016\" (0.40mm)", Image=//media.digikey.com/Photos/Panasonic%20Photos/ERJ-PA2-Series.jpg, Minimum Quantity=1, Number of Terminations=2, Packaging="Cut Tape (CT)", Part Number=ERJ-2RKF4700X, Part Status=Active, Quantity Available=52644, Series=ERJ, Size / Dimension="0.039\" L x 0.020\" W (1.00mm x 0.50mm)", Unit Price (USD)=0.00496
SW1: library part CMP-05618-000007-1, "SWITCH TACTILE SPST-NO 0.05A 12V", Contact Current Rating=50mA, Contact Resistance=500mΩ, Manufacturer=Panasonic, Operating Force=2.2N, Temperature="-20°C to +70°C", Temperature Range High=+70°C, Temperature Range Low=-20°C, Voltage Rating Dc=12V, Automotive=No, Category=Switch, ComponentLink2Description=Datasheet, ComponentLink2URL=https://industrial.panasonic.com/cdbs/www-data/pdf/ATK0000/ATK0000C378.pdf, Device Class L1=Electromechanical, Device Class L2=Switches, Device Class L3="Tactile Switches", Digikey Description="SWITCH TACTILE SPST-NO 0.05A 12V", Electromechanical Life=100000Cycles, Height=1.55mm, Lead Free=Yes, Manufacturer Part Number=EVQ-P7A01P, Mount="Surface Mount", Mouser Description="SWITCH TACTILE SPST-NO 0.05A 12V", Octopart=https://octopart.com/evq-p7a01p-panasonic-29917075, Package=EVQ-P7A01P, RoHS=TRUE, Throw Configuration=SPST-NO
U1: library part CMP-0133-00143-2, "IC CONTROLLR LI-ION 4.2V SOT23-5", Case/Package=SOT-23, Drain to Source Resistance=350mR, Max Charge Current=500mA, Max Input Voltage=6V, Max Operating Temperature=85°C, Max Output Voltage=4.5V, Max Power Dissipation=1.54W, Min Operating Temperature=-40°C, Min Output Voltage=4.168V, Min Supply Voltage=3.75V, Output Voltage=4.2V, Voltage Rating=4.534V, Contact Plating=Tin, Height=0.051inch, Lead Free="Lead Free", Length=0.122inch, Max Supply Voltage=6V, Mount="Surface Mount", Number of Cells=1, Number of Channels=1, Number of Outputs=1, Number of Pins=5, Output Current=500mA, Packaging="Tape and Reel", Radiation Hardening=No, REACH SVHC="No SVHC", Termination=SMD/SMT, Weight=0.00709oz, Width=0.071inch
U2: library part CMP-0063-00882-4, "IC REG BUCK 1.8V 600MA SOT23-5", Case/Package=SOT-23, Frequency=2MHz, Max Input Voltage=5.5V, Max Operating Temperature=85°C, Max Output Current=600mA, Max Output Voltage=1.8V, Min Input Voltage=2.7V, Min Operating Temperature=-40°C, Min Output Voltage=1.1V, Package Quantity=1000, Quiescent Current=16uA, Switching Frequency=2.6MHz, Contact Plating=Tin, Efficiency=93%, Height=1.02mm, Lead Free="Lead Free", Length=2.92mm, Max Supply Voltage=5.5V, Min Supply Voltage=2.7V, Mount="Surface Mount", Nominal Output Voltage=1.8V, Number of Outputs=1, Number of Pins=5, Output Current=600mA, Output Type=Fixed, Output Voltage=1.8V, Packaging="Tape and Reel", Radiation Hardening=No, REACH SVHC="No SVHC", RoHS Compliant=Yes, Series=LM3671, Synchronous Rectifier=Yes, Termination=SMD/SMT, Width=1.6mm
U3: library part CMP-0063-01132-4, "IC REG BUCK 3.3V 600MA SOT23-5", Case/Package=SOT-23, Frequency=2MHz, Max Input Voltage=5.5V, Max Operating Temperature=85°C, Max Output Current=600mA, Max Output Voltage=3.3V, Min Input Voltage=2.7V, Min Operating Temperature=-40°C, Min Output Voltage=1.1V, Package Quantity=1000, Quiescent Current=16uA, Switching Frequency=2.6MHz, Contact Plating=Tin, Height=1.02mm, Lead Free="Lead Free", Length=2.92mm, Max Supply Voltage=5.5V, Min Supply Voltage=2.7V, Mount="Surface Mount", Nominal Output Voltage=3.3V, Number of Outputs=1, Number of Pins=5, Output Current=600mA, Output Type=Fixed, Output Voltage=3.3V, Packaging="Tape and Reel", REACH SVHC="No SVHC", RoHS Compliant=Yes, Termination=SMD/SMT, Width=1.6mm
U4: library part CMP-0251-00627-2, "IC INTFACE SPECIALIZED TSOT23-6", Case/Package=SOT-23-6, Max Operating Temperature=125°C, Max Power Dissipation=727W, Max Supply Voltage=5.5V, Min Operating Temperature=-40°C, Min Supply Voltage=2.7V, Number of Voltages Monitored=1, Operating Supply Current=7uA, Undervoltage Threshold=1.8V, Contact Plating=Tin, Height=0.73mm, Length=4mm, Mount="Surface Mount", Number of Pins=6, Output Type=PUSH-PULL, Package Quantity=1, Packaging="Tape and Reel", Radiation Hardening=No, RoHS Compliant=Yes, Series=-, Watchdog Timer=No, Width=4mm
Y1: "SMD Tuning Fork Crystal", Package=None, Availability=Unavailable, MF="{'manufacturer': u'ECS Inc.'}", MP=ECS-.327-12.5-16-TR, Price=None
Y2: "The sub miniature ECX-32 is a compact SMD Crystal. The 3.2 x 2.5 x 0.8 mm ceramic package is ideal for todayâ€™s SMD manufacturing environment.", Package=None, Availability=Unavailable, MF="{'manufacturer': u'ECS Inc.'}", MP=ECS-80-12-33-JGN-TR, Price=None

## Free pads (board coordinates)
  rect 50x50 smd far side rot 30: 19(2145,1653)
  rect 50x50 smd far side: 20(2175,1455) 21(2175,1534)
  rect 50x50 smd far side rot 45: 22(2105,1708)
  round 50 smd far side: 23(2043,1405) 24(2046,1338) 25(1976,1405) 26(1976,1339)

## Via types
v1: diameter 18, hole 8, Top Layer to Bottom Layer, tented both sides, 34 vias
v2: diameter 17.72, hole 8, Top Layer to Bottom Layer, tented both sides, 33 vias
v3: diameter 17.72, hole 7.87, Top Layer to Bottom Layer, tented both sides, 14 vias

## Nets (pads, with @x,y where several pads share a name; then routed paths per layer and width w, separated by ;. In a path a pad name is that pad's centre, name@x,y a point inside that pad or via, vN(x,y) a via of type N, cw(c..) or ccw(c..) an arc to the next point about the centre after c; other vN are vias at no path point)
3.3V: C5.1 C7.1 C13.1 C16.1 C17.1 C18.1 IC2.1 IC2.9 IC2.24 IC2.36 IC2.48 IC3.J1 IC3.K9 J12.8 L2.2 pad.25 R4.1 R15.1 U3.4 | length 2694.5
  Top Layer w6: C5.1@1567.6,1150.85 IC3.J1 ; R4.1 1785.49,1105.71 1789,1109.22 1789,1208.84 1801.22,1221.06 1801.22,1231 1805.67,1235.44 1815.08,1235.44 v2(1817,1237.36) IC2.9
  Top Layer w8: L2.2 1288.4,1701.08 U3.4 1339.15,1615.36 C7.1 1343.51,1611 v2(1367,1611) ; v3(1531,1165) 1546,1150 1566.75,1150 C5.1@1567.6,1150.85 ; IC3.K9 IC3.K9 1602.94,1347.94 v2(1603,1348) ; C13.1@1794,1400 C13.1 1820,1398 1823.16,1394.84 IC2.1 ; IC2.1@1850,1394.87 v2(1850,1417) 1855.4,1422.4 IC2.48 1876.26,1423.67 1876.26,1444.74 1861.65,1459.35 1861.65,1468.11 C18.1 ; v2(2055.56,1076.85) 2062.85,1076.85 2073.96,1087.96 2073.96,1089.96 2092.53,1108.53 2092.53,1149.22 IC2.24 ; IC2.36 2122.2,1395.42 v2@2149,1395.42
  Mid Layer 1 w6: v2(1817,1237.36) 1817,1319 1850,1352 v2(1850,1417)
  Mid Layer 1 w8: v2(1367,1611) 1420,1558 1420,1419 1439,1400 1579,1400 1603,1376 v2(1603,1348) ; v3(1531,1165) 1531.86,1165.86 1531.86,1185.86 1564,1218 1564,1325 1586,1347 1602,1347 v2(1603,1348) ; v2(2055.56,1076.85) 2055.56,1229.02 2057,1230.46 2057,1378.14 2072,1393.14 ; v2(2149,1395) 2147.14,1393.14 2072,1393.14 ; v2(1603,1348) 1673,1348 1742,1417 v2(1850,1417) 2009,1417 2032.86,1393.14 2072,1393.14
  Bottom Layer w6: v2(1850,1417) 1958,1417 1970,1405 pad.25
  Bottom Layer w8: J12.8 1530.63,1135.68 1530.63,1164.63 v3(1531,1165)
+1.8V: C4.1 C8.1 C9.1 C10.1 IC3.C2 IC3.C9 IC3.D1 IC3.D10 IC3.J9 J12.10 L1.2 U2.4 | length 1098.8
  Top Layer w6: C9.1 1423,1430 1469.17,1383.83 IC3.D10 IC3.C9 1449.49,1325 ; v3(1443,1150) C10.1 1469.17,1150.17 IC3.D1 IC3.C2 1449.49,1325 ; C8.1 1590.72,1371 IC3.J9 1544.72,1325 1449.49,1325
  Top Layer w8: C4.1 1194.16,1231.49 U2.4@1201.6,1238.93 ; U2.4 U2.4@1201.6,1238.93 ; v3(1443,1150) 1404,1150 1326,1072 1221,1072 1206.52,1086.48 L1.2 1201.6,1132.92 U2.4@1201.6,1238.93
  Bottom Layer w6: v3(1443,1150) 1460.43,1150 1467.27,1143.16 J12.10
BAT+: C2.1 C3.1 C6.1 C14.1 D1.1 pad.19 pad.21 Q2.2 R9.1 U1.3 U2.1 U3.1 U4.6 | length 1758.2
  Top Layer w8: v2(1151,1531) 1211.96,1531 U3.1 1213.6,1480.11 C6.1 1224.22,1465.27 1224.22,1452.78 1252.17,1424.83 1252.17,1415.83 C3.1 ; U2.1 1276.4,1379.6 1263,1393 1263,1405 C3.1 ; v2(1816,1538) 1629,1538 1619.12,1528.12 1420.12,1528.12 1301,1409 C3.1 ; U1.3 1919.08,1734.63 1961,1734.63 ; v2(1975,1557) 1974.88,1557.12 1974.88,1603.68 Q2.2 ; v3(2010,1622) 2011,1621 2011,1612 2002.8,1603.8 Q2.2 ; R9.1 2032.17,1730.3 1986.57,1730.3 C2.1 1982.24,1734.63 1961,1734.63 ; 1961,1734.63 1961,1666 1974.76,1652.24 Q2.2
  Bottom Layer w8: U4.6 1149.59,1532.41 v2(1151,1531) ; v2(1816,1538) 1957,1538 1975,1556 v2(1975,1557) ; v3(2010,1622) 2010.11,1622.11 2010.11,1644.69 D1.1 2013.1,1647.68 2020.25,1647.68 2020.81,1648.24 C14.1 2046.02,1650.62 2142.62,1650.62 pad.19 2146,1652 cw(c2076,1581.99) 2175,1581.99 pad.21
BLUE: IC2.13 LED1.1 | length 939.9
  Top Layer w6: v2(1694.84,1081.35) 1695.49,1082 1864,1082 1877.53,1095.53 IC2.13
  Bottom Layer w6: LED1.1 1057.59,1218 1090,1218 1106,1202 1352,1202 1472.65,1081.35 v2(1694.84,1081.35)
BOOT0: IC2.44 R3.1 | length 106.3
  Top Layer w6: R3.1 1930.13,1474.87 1956.27,1448.73 IC2.44
CHRG: IC2.41 R1.1 U1.1 | length 281.3
  Top Layer w6: U1.1 1924.2,1654.69 R1.1 1924.2,1577.8 1980,1522 1980,1483.14 2005.64,1457.5 2005.64,1457.36 2015.32,1447.68 IC2.41
D+: IC2.31 J1.A6 J1.B6 | length 990.8
  Top Layer w6: v2(1588.81,1693.2) 1589.19,1693.58 v2(1640.55,1693.58) ; IC2.31 2121.83,1296.21 2157.79,1296.21 v2(2158,1296)
  Bottom Layer w6: v2(1588.81,1693.2) 1604.09,1677.92 J1.B6 1604.09,1599.91 1639,1565 1758.86,1565 1789,1534.86 1789,1399 1894,1294 2156,1294 v2(2158,1296) ; J1.A6 1624,1728.13 1624,1710.13 v2(1640.55,1693.58)
D-: IC2.32 J1.A7 J1.B7 | length 884
  Top Layer w6: IC2.32 2121.72,1316 2141.04,1316 v2(2141.14,1315.9)
  Bottom Layer w6: J1.A7 1604.09,1704.91 1623.78,1685.22 J1.B7 1623.78,1597.22 1646,1575 1766,1575 1799,1542 1799,1403.14 1898.14,1304 2129.24,1304 v2(2141.14,1315.9)
EN_1.8V: IC2.10 U2.3 | length 733.4
  Top Layer w6: v2(1828.87,1217.99) 1829.02,1217.84 1849.81,1217.84 IC2.10
  Bottom Layer w6: v2(1201,1296) 1204.17,1296 1215.17,1285 1529,1285 1550,1306 1777,1306 1800.14,1282.86 1800.14,1223.86 1806,1218 v2(1828.87,1217.99)
EN_3.3V: U3.3 U4.5 | length 186.8
  Top Layer w6: v2(1287.56,1562.98) 1287.98,1562.56 1287.98,1533.06 U3.3
  Bottom Layer w6: U4.5 1186.99,1540.01 1198,1529 1241,1529 1274.98,1562.98 v2(1287.56,1562.98)
ENABLE_RADAR: IC2.21 IC3.F10 J12.6 | length 832.6
  Top Layer w6: IC3.F10 1527.43,1348.68 v2(1527.43,1341.99) ; v2(1527.03,1230.9) v2(1527,1307) ; v3(2019,1074) 2019,1095.01 2025.32,1101.34 2025.32,1119.18 2032.1,1125.96 2032.1,1147.84 IC2.21
  Bottom Layer w6: v2(1527,1307) 1527.43,1307.43 v2(1527.43,1341.99) ; v2(1527.03,1230.9) 1593.86,1164.06 1593.86,1135.31 1593.86,1110.14 1611,1093 1682.65,1093 1687.86,1098.21 1770.67,1098.21 1775.39,1102.94 1831.24,1102.94 1869.52,1064.66 1924.91,1064.66 1934.25,1074 v3(2019,1074)
GND: C1.2 C2.2 C3.2 C4.2 C5.2 C6.2 C7.2 C8.2 C9.2 C10.2 C11.1 C12.2 C13.2 C16.2 C17.2 C18.2 IC2.8 IC2.23 IC2.35 IC2.47 IC2.49 IC3.A2 IC3.A3 IC3.A4 IC3.A5 IC3.A6 IC3.A7 IC3.A8 IC3.A9 IC3.B2 IC3.B9 IC3.B10 IC3.C1 IC3.C10 IC3.D2 IC3.D9 IC3.E1 IC3.E2 IC3.E9 IC3.E10 IC3.F1 IC3.F2 IC3.F9 IC3.G1 IC3.G10 IC3.H1 IC3.H2 IC3.H9 IC3.J3 IC3.J5 IC3.J6 IC3.J8 IC3.K4 IC3.K5 IC3.K7 J1.A1 J1.A12 J1.B1 J1.B12 J1.S1 J1.S2 J1.S3 J1.S4 J12.9 J12.S1 J12.S2 pad.20 pad.26 Q3.2 R2.1 R3.2 R5.1 R6.1 R7.2 R8.1 R10.2 R13.1 R14.1 SW1.2 SW1.2' U1.2 U2.2 U3.2 U4.2 Y2.2 Y2.4 Y3.2 Y3.4 | length 378.2
  Top Layer w8: IC3.D9 IC3.E9 IC3.E10 IC3.F9 ; IC3.G1 IC3.H1 ; IC3.G10 IC3.H9 ; v1(1566,1420) 1566,1440.08 Y3.4 ; IC3.K4 IC3.K5 ; IC2.8 1881.95,1257.05 v1(1884,1255) ; IC2.47 1897.21,1389.79 v1(1899,1388) ; C16.2 2045.5,1106.5 2061.76,1122.76 2062.76,1122.76 2072.47,1132.47 2072.47,1148.84 IC2.23 2074.38,1227.38 v1(2079,1232)
  other v1: 1507,1060 1501,1101 1356,1148 2015,1206 1921,1207 1359,1227 1472,1239 1497,1239 1431,1245 1955,1260 2039,1260 1070,1296 1474,1304 1499,1304 1431,1321 2086,1321 1360,1324 1901,1342 2008,1368 1494.84,1382 1064,1407 1683,1450 1722,1495 2065,1495 1335,1498 1928,1508 1521,1555 1861,1564 2071.04,1672.77 2027,1761
GREEN: IC2.11 LED1.4 | length 901.8
  Top Layer w6: v2(1808,1198) IC2.11
  Bottom Layer w6: LED1.4 1048.69,1274.47 1104.2,1274.47 1114.2,1284.47 1185.68,1284.47 1195.68,1274.47 1532.61,1274.47 1554.14,1296 1772.86,1296 1790.14,1278.72 1790.14,1217.36 1808,1199.5 v2(1808,1198)
INTERRUPT: IC2.39 IC3.K8 | length 611.3
  Top Layer w6: IC3.K8 1620.74,1328.2 v2(1621.39,1328.85) ; v2(1763.6,1441.24) 1813.34,1441.24 1814.84,1439.75 v2(1815.86,1439.75) ; v2(2037,1467) 2038.13,1465.87 2049.13,1465.87 2054.69,1460.31 IC2.39
  Bottom Layer w6: v2(1621.39,1328.85) 1685.85,1328.85 1705,1348 1705,1424 1722.24,1441.24 v2(1763.6,1441.24) ; v2(1815.86,1439.75) 1843.11,1467 v2(2037,1467)
"INTERRUPT 2": IC2.20 J12.5 | length 495.6
  Top Layer w6: v3(2000.14,1094) 2015.32,1109.18 IC2.20
  Bottom Layer w6: J12.5 1624.75,1107.25 1628.26,1103.74 1679.24,1103.74 1683.84,1108.34 1763.19,1108.34 1767.79,1112.94 1835.38,1112.94 1873.66,1074.66 1920.76,1074.66 1940.11,1094 v3(2000.14,1094)
MOT-: C14.2 D1.2 pad.22 Q3.3 | length 140.9
  Bottom Layer w8: Q3.3 2010.21,1727.74 D1.2 2012.06,1696.09 2041.79,1696.09 C14.2 2057.39,1708 pad.22
NetC11_2: C11.2 IC3.H10 Y3.3 | length 154.2
  Top Layer w6: C11.2 1506.99,1448 Y3.3 1512.18,1449.25 1528.87,1432.57 1528.87,1412.13 1547.91,1393.09 IC3.H10
NetC12_1: C12.1 IC3.J10 Y3.1 | length 224.1
  Top Layer w6: IC3.J10 1567.6,1394.6 1585,1412 1602,1412 1612,1422 1612,1479 ; Y3.1 1587.61,1488 1603,1488 1612,1479 ; C12.1 1636.17,1487.17 1620.17,1487.17 1612,1479
NetC15_1: C15.1 Q2.1 R9.2 | length 147.3
  Top Layer w8: R9.2 2032.79,1658.21 2049.57,1641.43 Q2.1@2049.57,1618.76 ; Q2.1 Q2.1@2049.57,1618.76 ; C15.1 2057.38,1626.57 Q2.1@2049.57,1618.76
NetIC2_3: IC2.3 Y1.1 | length 78.8
  Top Layer w7: Y1.1 1781.89,1359.68 1804.32,1359.68 1808.53,1355.47 IC2.3
NetIC2_4: IC2.4 Y1.2 | length 79.8
  Top Layer w6: Y1.2 1782.39,1329.56 1800.56,1329.56 1806.79,1335.79 IC2.4
NetIC2_5: IC2.5 Y2.1 | length 211.8
  Top Layer w6: Y2.1 1703.49,1264.69 1708.58,1269.79 1708.58,1295.58 1715,1302 1797.86,1302 1811.96,1316.1 IC2.5
NetIC2_6: IC2.6 Y2.3 | length 191.1
  Top Layer w6: Y2.3 1764.1,1192.8 1764.1,1215.1 1778,1229 1778,1268 1806.42,1296.42 IC2.6
NetJ1_A5: J1.A5 R5.2 | length 123.9
  Top Layer w6: v2(1637,1762) 1677,1722 R5.2
  Bottom Layer w6: v2(1637,1762) 1637,1758.83 1641.36,1754.47 1641.36,1730.45 J1.A5
NetJ1_B5: J1.B5 R6.2 | length 67.7
  Top Layer w6: v2(1584,1621) 1584.17,1620.83 1584.17,1603.83 R6.2
  Bottom Layer w6: v2(1584,1621) 1584.2,1621.2 1584.2,1660.03 J1.B5
NetL1_1: L1.1 U2.5 | length 113.1
  Top Layer w8: L1.1 1276.4,1128.92 U2.5
NetL2_1: L2.1 U3.5 | length 89.9
  Top Layer w8: U3.5 1213.6,1701.08 L2.1
NetLED1_2: LED1.2 R7.1 | length 50.8
  Bottom Layer w6: LED1.2 1059.5,1239.05 1096.78,1239.05 R7.1
NetQ2_3: Q2.3 R12.2 | length 104.7
  Top Layer w8: Q2.3 2052,1529 2069.28,1546.28 R12.2
NetQ3_1: Q3.1 R11.2 R13.2 | length 98.6
  Bottom Layer w8: R13.2 1856.94,1729.93 1856.94,1696.46 1857.52,1695.89 1920.28,1695.89 Q3.1
NetR2_2: R2.2 U1.5 | length 66.6
  Top Layer w6: U1.5 1828.36,1633.88 1832.44,1629.8 1832.44,1608.78 R2.2
NetR8_2: R8.2 U4.3 | length 86.1
  Bottom Layer w6: U4.3 1224.39,1746.2 R8.2
NetSW1_1: SW1.1 SW1.1' U4.1 | length 351.3
  Bottom Layer w6: SW1.1 SW1.1' 1109.02,1649.02 1130.64,1670.64 U4.1
RED: IC2.12 LED1.3 | length 910.2
  Top Layer w6: v2(1832,1178) 1849.66,1178 IC2.12
  Bottom Layer w6: LED1.3 1056.32,1252.81 1067.98,1264.47 1108.35,1264.47 1118.35,1274.47 1181.53,1274.47 1191.53,1264.47 1536.75,1264.47 1558.28,1286 1768,1286 1780.14,1273.86 1780.14,1196.02 1798.16,1178 v2(1832,1178)
RST: IC2.7 R4.2 | length 271.7
  Top Layer w6: R4.2 1718.16,1122.16 1726,1130 1775.49,1130 1779,1133.51 1779,1212.98 1789,1222.98 1789,1245 1820.73,1276.73 IC2.7
SPI_CLK: IC2.15 IC3.K2 | length 504.6
  Top Layer w6: IC3.K2 1629.27,1210.09 1645.93,1193.42 1645.93,1106.43 1687.86,1064.5 1878.5,1064.5 1916.9,1102.9 IC2.15
SPI_CLK2: IC2.26 J12.2 | length 552.7
  Top Layer w6: IC2.26 v3(2153,1198)
  Bottom Layer w6: J12.2 1719.24,1145.15 1736.08,1161.99 1763.47,1161.99 1787.47,1138 1838.6,1138 1881.95,1094.66 1912.48,1094.66 1941.82,1124 2063,1124 2137,1198 v3(2153,1198)
SPI_MISO: IC2.16 IC3.K3 | length 556.6
  Top Layer w6: IC3.K3 1588.4,1228.66 1623.34,1228.66 v3(1625,1227) ; v3(1629.07,1174.73) 1629.07,1109.14 1683.72,1054.5 1888.5,1054.5 1936.58,1102.58 IC2.16
  Bottom Layer w6: v3(1625,1227) 1625,1223.83 1629.07,1219.76 v3(1629.07,1174.73)
SPI_MISO2: IC2.27 J12.3 | length 638.4
  Top Layer w6: IC2.27 2122.28,1218.34 2169.34,1218.34 v3(2170,1219)
  Bottom Layer w6: J12.3 1687.74,1163.99 1695.74,1171.99 1767.62,1171.99 1789.61,1150 1840.75,1150 1886.09,1104.66 1908.34,1104.66 1939.68,1136 2056,1136 2139,1219 v3(2170,1219)
SPI_MOSI: IC2.17 IC3.K6 | length 643.7
  Top Layer w6: IC3.K6 1588.3,1288.83 1607.98,1269.14 1609,1269.14 1609,1261.88 v3(1609,1254.14) ; v3(1608,1191) 1608,1104 1667.5,1044.5 1903.5,1044.5 1956.27,1097.27 IC2.17
  Bottom Layer w6: v3(1608,1191) 1608,1235.93 1609,1236.93 v3(1609,1254.14)
SPI_MOSI2: IC2.28 J12.4 | length 652.5
  Top Layer w6: IC2.28 2121.94,1237.68 2152.68,1237.68 v3(2153,1238)
  Bottom Layer w6: J12.4 1656.24,1172.24 1671,1187 1766.75,1187 1792.61,1161.14 1843.75,1161.14 1890.23,1114.66 1904.2,1114.66 1935.54,1146 2050,1146 2133,1229 2140.83,1229 2149.83,1238 v3(2153,1238)
SPI_SS: IC2.18 IC3.J2 | length 613.9
  Top Layer w6: IC3.J2 1591.14,1186.54 1591.14,1101.86 1658.5,1034.5 1919.5,1034.5 1975.95,1090.95 IC2.18
SPI_SS2: IC2.25 J12.1 | length 445.9
  Top Layer w6: IC2.25 2123,1176.93 v3(2123,1156)
  Bottom Layer w6: J12.1 1750.73,1134.84 1757.57,1128 1834.46,1128 1877.8,1084.66 1916.62,1084.66 1943.96,1112 2079,1112 v3(2123,1156)
SWCLK: IC2.37 pad.23 R10.1 | length 140.7
  Top Layer w6: IC2.37@2094.03,1422.43 v2(2094,1448)
  Bottom Layer w6: pad.23@2044.86,1403.03 2043.19,1404.7 pad.23 2048.17,1399.83 2086.17,1399.83 R10.1 v2(2094,1448)
SWDIO: IC2.34 pad.24 R15.2 | length 167.9
  Top Layer w6: IC2.34 2122.36,1354.74 2147.26,1354.74 v3(2148,1354)
  Bottom Layer w6: pad.24 2076,1368 2134,1368 v3(2148,1354) 2163,1354 R15.2
VBAT_ADC: IC2.14 R12.1 R14.2 | length 680.8
  Top Layer w6: v2(1897.21,1131.52) IC2.14 ; R12.1 2109.9,1500.47 2133,1500.47 ; v2@2130.76,1474.24 v2(2133,1472) 2133,1500.47 ; R14.2 2133,1500.47
  Bottom Layer w6: v2(1897.21,1131.52) 1921.7,1156 2045.86,1156 2188,1298.14 2188,1411 2180,1419 2150.56,1419 2133,1436.56 v2(2133,1472)
VBAT_ADC_EN: C15.2
VIBRO: IC2.42 R11.1 | length 296.4
  Top Layer w6: v2(1898,1570) 1917.86,1570 1970,1517.86 1970,1479 1995.64,1453.36 IC2.42
  Bottom Layer w6: R11.1 1856.67,1610.33 1897,1570 v2(1898,1570)
VUSB: C1.1 J1.A4 J1.A9 J1.B4 J1.B9 R1.2 U1.4 | length 705
  Top Layer w8: v2(1695,1730) 1745,1730 1752,1737 1827.91,1737 U1.4 ; C1.1 1830.5,1739.59 U1.4 ; R1.2 1873,1610.87 1873,1726 1863,1736 1829.81,1736 U1.4
  Bottom Layer w8: J1.B4 J1.A9 1566.63,1730.25 1566.63,1754.63 1591.86,1779.86 1644.4,1779.86 1657.12,1767.14 1657.12,1766.65 1663.15,1760.62 J1.A4 ; J1.B9 J1.A4 ; v2(1695,1730) 1664.8,1730 J1.A4
pads on no net: IC2.2 IC2.19 IC2.22 IC2.29 IC2.30 IC2.33 IC2.38 IC2.40 IC2.43 IC2.45 IC2.46 IC3.B1 J1. J1.A8 J1.B8 J12.7 U4.4

## Polygon pours and split planes (outlines as drawn)
GND on Mid Layer 1 "GND_L02_P000" (solid, pour order 0): 1023.62,1299.21 1023.62,1535.43 cw(c1299.21,1535.43) 1299.21,1811.02 1929.13,1811.02 cw(c1929.13,1535.43) 2204.72,1535.43 2204.72,1299.21 cw(c1929.13,1299.21) 1929.13,1023.62 1299.21,1023.62 cw(c1299.21,1299.21)
GND on Mid Layer 2 "GND_L03_P001" (solid, pour order 1): 1023.62,1299.21 1023.62,1535.43 cw(c1299.21,1535.43) 1299.21,1811.02 1929.13,1811.02 cw(c1929.13,1535.43) 2204.72,1535.43 2204.72,1299.21 cw(c1929.13,1299.21) 1929.13,1023.62 1299.21,1023.62 cw(c1299.21,1299.21)
GND on Bottom Layer "GND_L04_P002" (solid, pour order 2): 1023.62,1299.21 1023.62,1535.43 cw(c1299.21,1535.43) 1299.21,1811.02 1929.13,1811.02 cw(c1929.13,1535.43) 2204.72,1535.43 2204.72,1299.21 cw(c1929.13,1299.21) 1929.13,1023.62 1299.21,1023.62 cw(c1299.21,1299.21)
GND on Top Layer "GND_L01_P003" (solid, pour order 3): 1023.62,1299.21 1023.62,1535.43 cw(c1299.21,1535.43) 1299.21,1811.02 1929.13,1811.02 cw(c1929.13,1535.43) 2204.72,1535.43 2204.72,1299.21 cw(c1929.13,1299.21) 1929.13,1023.62 1299.21,1023.62 cw(c1299.21,1299.21)

## Silkscreen, mask and mechanical layers (free items; w line width, h text height)
Bottom Overlay:
  text "VIBRO" at 2107.24,1615.2 h30 r305
  text "BAT+" at 2118,1501 h30 r270
  text "3V" at 1992,1439.33 h30
  text "CLK" at 2069,1438.31 h30
  text "GND" at 2118.31,1426 h30 r270
  text "G" at 1985,1289.31 h30
  text "DIO" at 2068,1289.31 h30